# Altium PCB OmniCore_SDR.PcbDoc (part 6 of 13)
Units mil, origin at the board's own origin, x right, y up, seen from the top; angles counter-clockwise.
Board outline 4724.72 x 2755.91 mil, 8 copper layers (Top, GND 1, Layer 1, Layer 2, GND 2, Layer 3, Power, Bottom), stack 40.468 mil thick; 530 components, 427 nets, 2315 pads, 1715 vias.
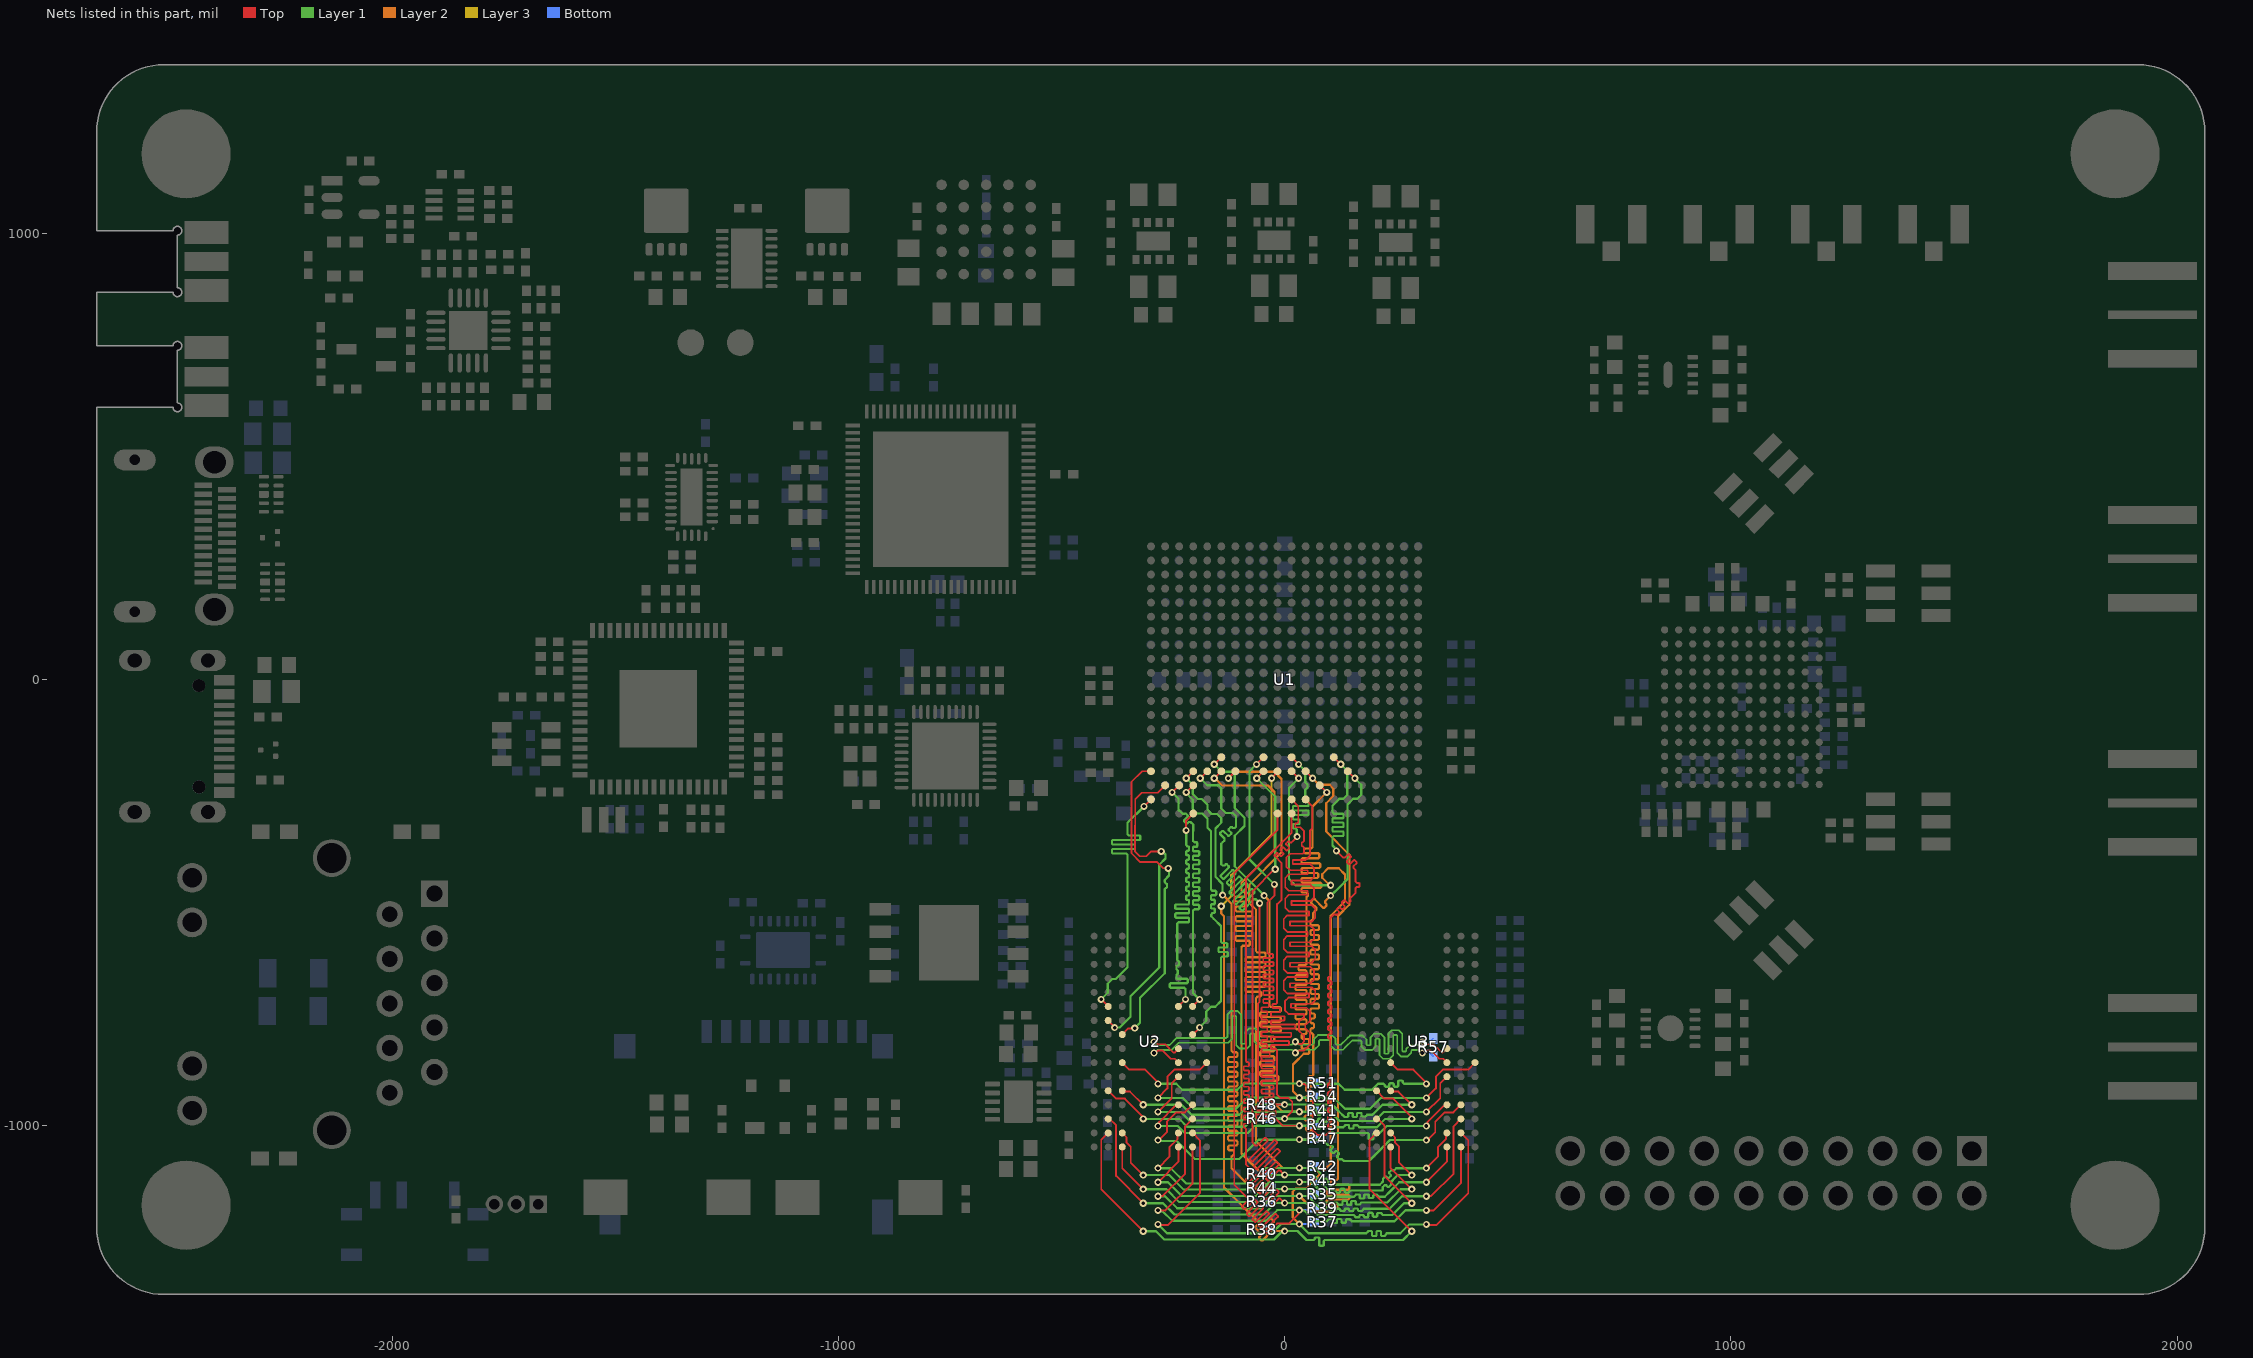
[diagram p11: the nets of this part, all layers, seen from the top]

## Via types
v1: diameter 16, hole 8, Top to Bottom, tented both sides, 1667 vias
v2: diameter 19.68, hole 7.87, Top to Bottom, 44 vias
v3: diameter 200, hole 125, Top to Bottom, 4 vias

## Nets (pads, with @x,y where several pads share a name; then routed paths per layer and width w, separated by ;. In a path a pad name is that pad's centre, name@x,y a point inside that pad or via, vN(x,y) a via of type N, cw(c..) or ccw(c..) an arc to the next point about the centre after c; other vN are vias at no path point) (continued)
DDR3_A4: R35.2 U1.M4 U2.P8 U3.P8 | length 2510.2
  Top w4.2: v1(-283.85,-1157.9) -282.92,-1156.97 -272.97,-1156.97 -223,-1107 -223,-1000.94 U2.P8@-206.5,-984.45 ; U1.M4@47,-205.51 47,-205.64 62.5,-221.14 v1(62.5,-221.26) ; v1(317.64,-1157.9) 318.58,-1156.97 328.53,-1156.97 378.5,-1107 378.5,-1000.94 U3.P8@394.99,-984.45
  Layer 1 w5: v1(-283.85,-1157.9) -268.1,-1157.9 -241,-1185 -53,-1185 -25.44,-1157.44 v1(33,-1157.44) 51.44,-1157.44 80,-1186 89,-1186 91.5,-1186 94.43,-1183.07 94.43,-1182.5 95.93,-1181 102.93,-1181 104.43,-1182.5 104.43,-1189.5 105.93,-1191 112.93,-1191 114.43,-1189.5 114.43,-1187.5 115.93,-1186 122.93,-1186 124.43,-1187.5 124.43,-1189.5 125.93,-1191 132.93,-1191 134.43,-1189.5 134.43,-1187.5 135.93,-1186 142.93,-1186 144.43,-1187.5 144.43,-1189.5 145.93,-1191 152.93,-1191 154.43,-1189.5 154.43,-1186.93 155.93,-1185.43 162.93,-1185.43 164.43,-1186.93 164.43,-1189.5 165.93,-1191 172.93,-1191 174.43,-1189.5 174.43,-1188.93 177.36,-1186 199,-1186 235,-1186 263.1,-1157.9 v1(317.64,-1157.9)
  Layer 2 w5: v1(33,-1157.44) 68,-1192.44 96.56,-1192.44 108.56,-1192.44 110,-1191 115.17,-1185.83 117.67,-1183.33 117.67,-1179.18 114.75,-1176.26 96.7,-1176.26 94.5,-1174.06 94.5,-1167.46 96.7,-1165.26 142.3,-1165.26 144.5,-1163.06 144.5,-1156.46 142.3,-1154.26 96.7,-1154.26 94.5,-1152.06 94.5,-1145.46 96.7,-1143.26 142.3,-1143.26 144.5,-1141.06 144.5,-1134.46 142.3,-1132.26 105.83,-1132.26 103.63,-1130.06 103.63,-1123.46 105.83,-1121.26 116.57,-1121.26 119.5,-1118.33 119.5,-1088 119.5,-530 145,-504.5 145,-392.49 93,-340.49 93,-277 109,-261 109,-243.93 100.83,-235.76 77,-235.76 v1(62.5,-221.26)
  Bottom w4.2: v1(33,-1157.44) 61.19,-1157.44 R35.2@65,-1153.64
DDR3_A5: R36.2 U1.L1 U2.P2 U3.P2 | length 2527.9
  Top w4.2: U2.P2@-395.48,-984.45 -392.56,-984.45 -377.95,-999.05 -377.95,-1112.33 v1(-316.85,-1173.42) ; v1(0,-1172.96) -8.48,-1164.48 -9.97,-1162.99 -13.44,-1162.99 -28.33,-1177.88 -30.29,-1177.88 -34.84,-1173.33 -34.84,-1171.38 -13.41,-1149.95 -13.41,-1148 -17.96,-1143.44 -19.91,-1143.44 -41.46,-1164.99 -43.41,-1164.99 -47.97,-1160.44 -47.97,-1158.48 -27.32,-1137.84 -27.32,-1135.89 -31.88,-1131.33 -33.83,-1131.33 -54.47,-1151.98 -56.42,-1151.98 -60.98,-1147.43 -60.98,-1145.47 -45.21,-1129.7 -45.21,-1127.75 -49.76,-1123.2 -51.71,-1123.2 -67.48,-1138.97 -69.43,-1138.97 -73.99,-1134.41 -73.99,-1132.46 -58.22,-1116.69 -58.22,-1114.74 -62.77,-1110.19 -64.72,-1110.19 -80.49,-1125.96 -82.45,-1125.96 -87,-1121.4 -87,-1119.45 -71.99,-1104.45 -71.99,-1100.97 -87,-1085.96 -87,-1028 -87,-1009 -87,-1006.9 -89.46,-1004.44 -90.42,-1004.44 -91.8,-1003.06 -91.8,-996.62 -90.42,-995.24 -81.58,-995.24 -80.2,-993.86 -80.2,-987.42 -81.58,-986.04 -90.42,-986.04 -91.8,-984.66 -91.8,-978.22 -90.42,-976.84 -81.58,-976.84 -80.2,-975.46 -80.2,-969.02 -81.58,-967.64 -90.42,-967.64 -91.8,-966.26 -91.8,-959.82 -90.42,-958.44 -81.58,-958.44 -80.2,-957.06 -80.2,-950.62 -81.58,-949.24 -90.42,-949.24 -91.8,-947.86 -91.8,-941.42 -90.42,-940.04 -81.58,-940.04 -80.2,-938.66 -80.2,-932.22 -81.58,-930.84 -90.42,-930.84 -91.8,-929.46 -91.8,-923.02 -90.42,-921.64 -81.58,-921.64 -80.2,-920.26 -80.2,-913.82 -81.58,-912.44 -90.42,-912.44 -91.8,-911.06 -91.8,-904.62 -90.42,-903.24 -81.58,-903.24 -80.2,-901.86 -80.2,-895.42 -81.58,-894.04 -90.42,-894.04 -91.8,-892.66 -91.8,-886.22 -90.42,-884.84 -81.58,-884.84 -80.2,-883.46 -80.2,-877.02 -81.58,-875.64 -90.42,-875.64 -91.8,-874.26 -91.8,-867.82 -90.42,-866.44 -81.65,-866.44 -80.27,-865.06 -80.27,-858.62 -81.65,-857.24 -84.54,-857.24 -87,-854.78 -87,-821 -87,-446 9.5,-349.5 15.5,-343.5 U1.L1@15.5,-300 ; U3.P2@206.02,-984.45 208.94,-984.45 223.55,-999.05 223.55,-1112.33 v1(284.64,-1173.42)
  Layer 1 w5: v1(-316.85,-1173.42) -272.58,-1173.42 -247,-1199 -47,-1199 -20.96,-1172.96 v1(0,-1172.96) 46.96,-1172.96 74,-1200 142,-1200 154.5,-1200 157.43,-1202.93 157.43,-1203.5 158.93,-1205 165.93,-1205 167.43,-1203.5 167.43,-1201.5 168.93,-1200 175.93,-1200 177.43,-1201.5 177.43,-1203.5 178.93,-1205 185.93,-1205 187.43,-1203.5 187.43,-1196.5 188.93,-1195 195.93,-1195 197.43,-1196.5 197.43,-1202.13 198.93,-1203.63 205.93,-1203.63 207.43,-1202.13 207.43,-1197.07 208.93,-1195.57 215.93,-1195.57 217.43,-1197.07 220.36,-1200 241,-1200 267.58,-1173.42 v1(284.64,-1173.42)
  Bottom w4.2: R36.2@-32,-1170.67 -29.71,-1172.96 v1(0,-1172.96)
DDR3_A6: R37.2 U1.L4 U2.R8 U3.R8 | length 2557.4
  Top w4.2: v1(-283.85,-1220.9) -282.75,-1222 -261,-1222 -190,-1151 -190,-1032.45 U2.R8@-206.5,-1015.94 ; U1.L4@15.5,-205.51 v1(31.25,-221.26) ; v1(317.64,-1220.9) 318.75,-1222 340.5,-1222 411.5,-1151 411.5,-1032.45 U3.R8@394.99,-1015.94
  Layer 1 w5: v1(-283.85,-1220.9) -263.75,-1241 -29,-1241 -8,-1220 32.57,-1220 v1(33,-1220.43) 53.57,-1241 101,-1241 180.5,-1241 183,-1241 185.93,-1238.07 185.93,-1237.5 187.43,-1236 194.43,-1236 195.93,-1237.5 195.93,-1245.5 197.43,-1247 204.43,-1247 205.93,-1245.5 205.93,-1237.5 207.43,-1236 214.43,-1236 215.93,-1237.5 215.93,-1245.23 217.43,-1246.73 224.43,-1246.73 225.93,-1245.23 225.93,-1243.93 228.86,-1241 259,-1241 279.1,-1220.9 v1(317.64,-1220.9) ; v1(31.25,-221.26) 9.5,-243.01 9.5,-446.5 24,-461 v1(103,-461)
  Layer 2 w5: v1(33,-1220.43) 18,-1205.43 18,-1148 25,-1141 47,-1141 58,-1130 76,-1112 77.77,-1110.23 77.77,-1106.09 72,-1100.32 72,-1097.21 76.66,-1092.54 79.77,-1092.54 85.55,-1098.31 89.69,-1098.31 95.5,-1092.5 103,-1085 103,-529 135,-497 135,-437 121,-423 97,-423 84,-436 84,-444 101,-461 v1(103,-461)
  Bottom w4.2: v1(33,-1220.43) 60.57,-1220.43 R37.2@65,-1216
DDR3_A7: R38.2 U1.K4 U2.R2 U3.R2 | length 2519.2
  Top w4.2: U2.R2@-395.48,-1015.94 -411,-1031.46 -411,-1142.27 v1(-316.85,-1236.41) ; v1(-29.31,-220.96) -29.31,-219.9 -15.99,-206.57 U1.K4@-15.99,-205.51 ; U3.R2@206.02,-1015.94 190.5,-1031.46 190.5,-1142.27 v1(284.64,-1236.41)
  Layer 1 w5: v1@-316.82,-1236.45 -288.55,-1236.45 -270,-1255 -24,-1255 -7.06,-1238.06 -2.1,-1238.06 v1(0,-1235.95) 28.95,-1235.95 49,-1256 62,-1256 64.5,-1256 67.43,-1253.07 67.43,-1251.5 68.93,-1250 75.93,-1250 77.43,-1251.5 77.43,-1267.52 78.93,-1269.02 85.93,-1269.02 87.43,-1267.52 87.43,-1258.93 90.36,-1256 108.07,-1256 265.06,-1256 v1(284.64,-1236.41)
  Layer 2 w5: v1(-142,-508) -142,-523.98 -135.76,-530.22 -135.76,-1138.24 -89.5,-1184.5 -87.73,-1186.27 -58.83,-1215.17 -58.83,-1219.31 -66.05,-1226.53 -66.05,-1228.86 -60.6,-1234.31 -58.27,-1234.31 -32.47,-1208.51 -30.14,-1208.51 -24.69,-1213.95 -24.69,-1216.28 -57.72,-1249.31 -57.72,-1251.64 -52.27,-1257.08 -49.94,-1257.08 -28.8,-1235.95 -25.27,-1235.95 v1(0,-1235.95)
  Layer 3 w5: v1(-142,-508) -119.5,-485.5 -119.5,-438.5 -29.31,-348.31 v1(-29.31,-220.96)
  Bottom w4.2: R38.2@-32,-1233 -29.05,-1235.95 v1(0,-1235.95)
DDR3_A8: R39.2 U1.K1 U2.T8 U3.T8 | length 2486.6
  Top w4.2: v1(-283.85,-1189.4) -267.4,-1189.4 -206.5,-1128.5 U2.T8@-206.5,-1047.44 ; U1.K1@-15.99,-300 -15.99,-336.99 -113,-434 -113,-1132 -104.75,-1140.25 -81.77,-1163.23 -81.77,-1166.71 -95.54,-1180.47 -95.54,-1182.42 -90.98,-1186.97 -89.03,-1186.97 -67.8,-1165.75 -65.85,-1165.75 -61.3,-1170.3 -61.3,-1172.25 -84.75,-1195.7 -84.75,-1197.65 -80.2,-1202.21 -78.24,-1202.21 -54.79,-1178.76 -52.84,-1178.76 -48.29,-1183.31 -48.29,-1185.26 -71.74,-1208.71 -71.74,-1210.67 -67.18,-1215.22 -65.23,-1215.22 -41.78,-1191.77 -39.83,-1191.77 -35.28,-1196.32 -35.28,-1198.27 -58.73,-1221.72 -58.73,-1223.68 -54.17,-1228.23 -52.22,-1228.23 -21.58,-1197.59 -19.63,-1197.59 -15.08,-1202.14 -15.08,-1204.09 -45.72,-1234.74 -45.72,-1236.69 -41.16,-1241.24 -39.21,-1241.24 -16.53,-1218.56 -13.56,-1218.56 10.44,-1218.56 30.74,-1198.26 30.74,-1191.2 v1(33,-1188.94) ; v1(317.64,-1189.4) 334.1,-1189.4 394.99,-1128.5 U3.T8@394.99,-1047.44
  Layer 1 w5: v1(-283.85,-1189.4) -282.02,-1191.23 -273.77,-1191.23 -252,-1213 -41,-1213 -16.94,-1188.94 v1(33,-1188.94) 33.99,-1189.93 43.93,-1189.93 68,-1214 92,-1214 94.5,-1214 97.43,-1211.07 97.43,-1210.5 98.93,-1209 105.93,-1209 107.43,-1210.5 107.43,-1216.5 108.93,-1218 115.93,-1218 117.43,-1216.5 117.43,-1210.5 118.93,-1209 125.93,-1209 127.43,-1210.5 127.43,-1215.65 128.93,-1217.15 135.93,-1217.15 137.43,-1215.65 137.43,-1211.07 138.93,-1209.57 145.93,-1209.57 147.43,-1211.07 150.36,-1214 161,-1214 246,-1214 270.6,-1189.4 v1(317.64,-1189.4)
  Bottom w4.2: v1(33,-1188.94) 60.88,-1188.94 R39.2@65,-1184.82
DDR3_A9: R40.2 U1.J4 U2.R3 U3.R3 | length 2405.6
  Top w4.2: U2.R3@-363.98,-1015.94 -363.98,-1016.41 -354.2,-1026.19 -354.2,-1037.47 -345,-1046.67 -345,-1082.28 v1(-316.85,-1110.43) ; v1(-62.5,-221) -62.5,-220.76 -47.49,-205.75 U1.J4@-47.49,-205.51 ; v1(-21,-425) -23,-425 -72,-474 -72,-981 -72,-1037.97 -65.49,-1044.48 -62.01,-1044.48 -44.6,-1027.07 -42.65,-1027.07 -38.1,-1031.62 -38.1,-1033.57 -77.82,-1073.3 -77.82,-1075.25 -73.27,-1079.8 -71.32,-1079.8 -23.43,-1031.92 -21.48,-1031.92 -16.93,-1036.47 -16.93,-1038.42 -68.96,-1090.45 -68.96,-1092.41 -64.4,-1096.96 -62.45,-1096.96 -17.18,-1051.69 -15.23,-1051.69 -10.68,-1056.24 -10.68,-1058.19 -55.95,-1103.46 -55.95,-1105.42 -51.39,-1109.97 -49.44,-1109.97 -19.92,-1080.45 -17.97,-1080.45 -13.41,-1085 -13.41,-1086.95 -42.94,-1116.48 -42.94,-1118.43 -38.38,-1122.98 -36.43,-1122.98 -13.45,-1100 -9.97,-1100 -8.48,-1101.48 v1(0,-1109.97) ; U3.R3@237.51,-1015.94 237.51,-1016.41 247.3,-1026.19 247.3,-1037.47 256.5,-1046.67 256.5,-1082.28 v1(284.64,-1110.43)
  Layer 1 w5: v1(-316.85,-1110.43) -258.57,-1110.43 -226,-1143 -71,-1143 -37.97,-1109.97 v1(0,-1109.97) 63.97,-1109.97 95,-1141 99,-1145 111.64,-1145 114.57,-1147.93 114.57,-1148.5 116.07,-1150 123.07,-1150 124.57,-1148.5 124.57,-1142.5 126.07,-1141 133.07,-1141 134.57,-1142.5 134.57,-1148.5 136.07,-1150 143.07,-1150 144.57,-1148.5 144.57,-1147.93 147.5,-1145 203,-1145 217.28,-1145 219,-1145 219.91,-1144.09 219.91,-1139.95 219.91,-1137.82 224.86,-1132.87 226.98,-1132.87 231.13,-1137.02 233.25,-1137.02 238.2,-1132.07 238.2,-1129.95 238.19,-1125.81 248,-1116 253.57,-1110.43 v1(284.64,-1110.43) ; v1(-62.5,-221) -21,-262.51 v1(-21,-425)
  Bottom w4.2: R40.2@-32,-1108.33 -30.37,-1109.97 v1(0,-1109.97)
DDR3_A10: R41.2 U1.F5 U2.L7 U3.L7 | length 2387.8
  Top w4.2: v1(-283.85,-968.93) -253,-938.07 -253,-904.96 U2.L7@-238,-889.96 ; v1(-157.72,-189.76) U1.F5@-141.98,-174.02 ; v1(317.64,-968.93) 348.5,-938.07 348.5,-904.96 U3.L7@363.5,-889.96
  Layer 1 w5: v1(-283.85,-968.93) -233.07,-968.93 -214,-988 -95,-988 -75.47,-968.47 v1(33,-968.47) 55,-968.47 57.5,-968.47 60.43,-965.54 60.43,-962.99 61.93,-961.49 68.93,-961.49 70.43,-962.99 70.43,-973.48 71.93,-974.98 78.93,-974.98 80.43,-973.48 80.43,-963.07 81.93,-961.57 88.93,-961.57 90.43,-963.07 90.43,-965.54 93.36,-968.47 102.47,-968.47 123,-989 202,-989 222.07,-968.93 v1(317.64,-968.93) ; v1(-157.72,-189.76) -140.73,-206.76 -118.24,-206.76 -111.73,-213.27 -111.73,-288 -97.73,-302 -90,-309.73 -90,-328.27 -111.73,-350 -111.73,-418.27 v1(-46,-484)
  Layer 2 w5: v1(-46,-484) -34.03,-495.97 -34.03,-518 -34.03,-728.48 -34.03,-730.98 -31.1,-733.91 -11.23,-733.91 -9.03,-736.11 -9.03,-742.71 -11.23,-744.91 -52.8,-744.91 -55,-747.11 -55,-753.71 -52.8,-755.91 -11.23,-755.91 -9.03,-758.11 -9.03,-764.71 -11.23,-766.91 -52.8,-766.91 -55,-769.11 -55,-775.71 -52.8,-777.91 -11.23,-777.91 -9.03,-780.11 -9.03,-786.71 -11.23,-788.91 -52.8,-788.91 -55,-791.11 -55,-797.71 -52.8,-799.91 -25.56,-799.91 -23.36,-802.11 -23.36,-808.71 -25.56,-810.91 -52.8,-810.91 -55,-813.11 -55,-819.71 -52.8,-821.91 -25.7,-821.91 -23.5,-824.11 -23.5,-830.71 -25.7,-832.91 -52.8,-832.91 -55,-835.11 -55,-841.71 -52.8,-843.91 -25.7,-843.91 -23.5,-846.11 -23.5,-852.71 -25.7,-854.91 -52.8,-854.91 -55,-857.11 -55,-863.71 -52.8,-865.91 -25.7,-865.91 -23.5,-868.11 -23.5,-874.71 -25.7,-876.91 -52.8,-876.91 -55,-879.11 -55,-885.71 -52.8,-887.91 -16.7,-887.91 -14.5,-890.11 -14.5,-896.71 -16.7,-898.91 -50.36,-898.91 -52.56,-901.11 -52.56,-907.71 -50.36,-909.91 -36.96,-909.91 -34.03,-912.84 -34.03,-929 -34.03,-938.96 -4.53,-968.47 v1(33,-968.47)
  Bottom w4.2: v1(33,-968.47) 63.08,-968.47 R41.2@65,-966.55
DDR3_A11: R42.2 U1.G4 U2.R7 U3.R7 | length 2402
  Top w4.2: v1(-283.85,-1094.91) -258.2,-1069.26 -258.2,-1047.89 -240.21,-1029.9 -240.21,-1018.15 U2.R7@-238,-1015.94 ; v1(-126.23,-221.26) U1.G4@-110.48,-205.51 ; v1(317.64,-1094.91) 343.3,-1069.26 343.3,-1047.89 361.29,-1029.9 361.29,-1018.15 U3.R7@363.5,-1015.94
  Layer 1 w5: v1(-283.85,-1094.91) -255.09,-1094.91 -221,-1129 -77,-1129 -42.45,-1094.45 v1(33,-1094.45) 68.45,-1094.45 73.5,-1099.5 75.27,-1101.27 82.34,-1108.34 82.34,-1112.48 81.83,-1112.99 81.83,-1115.11 86.78,-1120.06 88.91,-1120.06 90.96,-1118 93.08,-1118 98.03,-1122.95 98.03,-1125.08 95.98,-1127.13 95.98,-1129.25 100.93,-1134.2 103.05,-1134.2 105.25,-1132 126,-1132 213,-1132 218.5,-1126.5 220.27,-1124.73 220.27,-1120.59 220.26,-1118.46 225.21,-1113.51 227.33,-1113.51 230.9,-1117.08 233.02,-1117.08 237.97,-1112.13 237.97,-1110.01 234.41,-1106.45 234.41,-1104.33 239.36,-1099.38 241.48,-1099.38 245.62,-1099.38 250.09,-1094.91 v1(317.64,-1094.91)
  Layer 2 w5: v1(-126.23,-221.26) -111.43,-206.46 -23.31,-206.46 -7,-222.77 -7,-387 -79.5,-459.5 -79.5,-500.5 -64,-516 -64,-606 -64,-608.5 -61.07,-611.43 -45.23,-611.43 -43.03,-613.63 -43.03,-620.23 -45.23,-622.43 -85.8,-622.43 -88,-624.63 -88,-631.23 -85.8,-633.43 -45.23,-633.43 -43.03,-635.63 -43.03,-642.23 -45.23,-644.43 -85.8,-644.43 -88,-646.63 -88,-653.23 -85.8,-655.43 -45.23,-655.43 -43.03,-657.63 -43.03,-664.23 -45.23,-666.43 -85.8,-666.43 -88,-668.63 -88,-675.23 -85.8,-677.43 -45.23,-677.43 -43.03,-679.63 -43.03,-686.23 -45.23,-688.43 -85.8,-688.43 -88,-690.63 -88,-697.23 -85.8,-699.43 -54.68,-699.43 -52.48,-701.63 -52.48,-708.23 -54.68,-710.43 -61.07,-710.43 -64,-713.36 -64,-728.18 -64,-755.93 -64,-833 -64,-978 -64,-1034.98 -4.53,-1094.45 v1(33,-1094.45)
  Bottom w4.2: v1(33,-1094.45) 61.82,-1094.45 R42.2@65,-1091.27
DDR3_A12: R43.2 U1.E4 U2.N7 U3.N7 | length 2349.8
  Top w4.2: v1(-283.85,-1000.42) -281.6,-998.17 -281.6,-991.6 -245.16,-955.16 -240.21,-955.16 U2.N7@-238,-952.95 ; v1(-189.22,-221.26) U1.E4@-173.47,-205.51 ; v1(-56.2,-501.2) -56.2,-722.26 -60,-726.06 -60,-943.92 -53.56,-950.36 -53.56,-953.84 -56.02,-956.3 -62.42,-956.3 -63.8,-957.68 -63.8,-964.12 -62.42,-965.5 -21.38,-965.5 -20,-966.88 -20,-973.32 -21.38,-974.7 -62.42,-974.7 -63.8,-976.08 -63.8,-982.52 -62.42,-983.9 -20.02,-983.9 -17.92,-986 -3.96,-999.96 v1(33,-999.96) ; v1(317.64,-1000.42) 319.9,-998.17 319.9,-991.6 356.34,-955.16 361.29,-955.16 U3.N7@363.5,-952.95
  Layer 1 w5: v1(-283.85,-1000.42) -239.58,-1000.42 -224,-1016 -83,-1016 -66.96,-999.96 v1(33,-999.96) 53,-999.96 65.5,-999.96 68.43,-1002.89 68.43,-1005.21 69.93,-1006.71 76.93,-1006.71 78.43,-1005.21 78.43,-1002.89 81.36,-999.96 93.96,-999.96 110,-1016 185.5,-1016 188.43,-1018.93 188.43,-1029.38 189.93,-1030.88 196.93,-1030.88 198.43,-1029.38 198.43,-1018.93 201.36,-1016 213,-1016 228.58,-1000.42 232.29,-1000.42 v1(317.64,-1000.42) ; v1(-189.22,-221.26) -173.48,-237 -148,-237 -142,-243 -142,-288.99 -132.23,-298.75 -116.25,-298.75 -109,-306 -109,-322 -109,-329.68 -111.93,-332.61 -116.07,-332.61 -118.27,-330.41 -120.39,-330.41 -125.34,-335.36 -125.34,-337.48 -119.68,-343.14 -119.68,-345.27 -124.63,-350.22 -126.75,-350.22 -137.87,-339.09 -139.99,-339.09 -144.94,-344.04 -144.94,-346.17 -134.85,-356.25 -134.85,-360.4 -138.73,-364.27 -142,-367.54 -142,-371 -142,-413.9 -139.07,-416.83 -134.93,-416.83 -131.84,-413.74 -129.72,-413.74 -124.77,-418.69 -124.77,-420.81 -143.05,-439.1 -143.05,-441.22 -138.1,-446.17 -135.98,-446.17 -117.33,-427.52 -115.21,-427.52 -110.26,-432.47 -110.26,-434.59 -129.54,-453.87 -129.54,-455.99 -124.59,-460.94 -122.47,-460.94 -103.19,-441.66 -101.07,-441.66 -96.12,-446.61 -96.12,-448.73 -123.54,-476.15 -123.54,-478.27 -118.59,-483.22 -116.47,-483.22 -89.05,-455.8 -86.93,-455.8 -81.98,-460.75 -81.98,-462.87 -115.48,-496.37 -115.48,-498.49 -110.53,-503.44 -108.41,-503.44 -74.91,-469.94 -72.78,-469.94 -67.83,-474.89 -67.83,-477.01 -101.34,-510.52 -101.34,-512.64 -96.39,-517.59 -94.26,-517.59 -69.11,-492.43 -64.97,-492.43 -63.2,-494.2 v1(-56.2,-501.2)
  Bottom w4.2: v1(33,-999.96) 62.77,-999.96 R43.2@65,-997.73
DDR3_A13: R44.2 U1.D4 U2.T3 U3.T3 | length 2411.6
  Top w4.2: U2.T3@-363.98,-1047.44 -363.98,-1094.8 v1(-316.85,-1141.93) ; v1(-220.72,-221.26) U1.D4@-204.97,-205.51 ; U3.T3@237.51,-1047.44 237.51,-1094.8 v1(284.64,-1141.93)
  Layer 1 w5: v1(-316.85,-1141.93) -265.07,-1141.93 -236,-1171 -59,-1171 -29.46,-1141.46 v1(0,-1141.46) 55.46,-1141.46 86,-1172 104,-1172 116.5,-1172 119.43,-1174.93 119.43,-1175.5 120.93,-1177 127.93,-1177 129.43,-1175.5 129.43,-1169.5 130.93,-1168 137.93,-1168 139.43,-1169.5 139.43,-1175.5 140.93,-1177 147.93,-1177 149.43,-1175.5 149.43,-1170.06 150.93,-1168.56 157.93,-1168.56 159.43,-1170.06 159.43,-1174.93 160.93,-1176.43 167.93,-1176.43 169.43,-1174.93 172.36,-1172 190,-1172 230,-1172 260.07,-1141.93 v1(284.64,-1141.93) ; v1(-220.72,-221.26) -206,-235.98 -206,-256.48 -195.12,-267.36 -185.88,-267.36 -173,-280.25 -173,-292 -164,-301 -151,-301 -142,-310 -142,-320.53 -155,-333.53 -155,-442 -139.1,-457.9 v1(-139.1,-483)
  Layer 2 w5: v1(-139.1,-483) -138.36,-483 -119,-502.36 -119,-708 -119,-829.5 -119,-832 -116.07,-834.93 -108.2,-834.93 -106,-837.13 -106,-843.73 -108.2,-845.93 -124.56,-845.93 -126.76,-848.13 -126.76,-854.73 -124.56,-856.93 -108.2,-856.93 -106,-859.13 -106,-865.73 -108.2,-867.93 -124.56,-867.93 -126.76,-870.13 -126.76,-876.73 -124.56,-878.93 -108.2,-878.93 -106,-881.13 -106,-887.73 -108.2,-889.93 -124.56,-889.93 -126.76,-892.13 -126.76,-898.73 -124.56,-900.93 -108.2,-900.93 -106,-903.13 -106,-909.73 -108.2,-911.93 -124.56,-911.93 -126.76,-914.13 -126.76,-920.73 -124.56,-922.93 -108.2,-922.93 -106,-925.13 -106,-931.73 -108.2,-933.93 -124.56,-933.93 -126.76,-936.13 -126.76,-942.73 -124.56,-944.93 -108.2,-944.93 -106,-947.13 -106,-953.73 -108.2,-955.93 -124.56,-955.93 -126.76,-958.13 -126.76,-964.73 -124.56,-966.93 -108.2,-966.93 -106,-969.13 -106,-975.73 -108.2,-977.93 -124.56,-977.93 -126.76,-980.13 -126.76,-986.73 -124.56,-988.93 -108.2,-988.93 -106,-991.13 -106,-997.73 -108.2,-999.93 -124.56,-999.93 -126.76,-1002.13 -126.76,-1008.73 -124.56,-1010.93 -108.2,-1010.93 -106,-1013.13 -106,-1019.73 -108.2,-1021.93 -124.56,-1021.93 -126.76,-1024.13 -126.76,-1030.73 -124.56,-1032.93 -108.2,-1032.93 -106,-1035.13 -106,-1041.73 -108.2,-1043.93 -124.48,-1043.93 -126.68,-1046.13 -126.68,-1052.73 -124.48,-1054.93 -116.07,-1054.93 -113.87,-1057.13 -113.87,-1063.73 -116.07,-1065.93 -119,-1068.86 -119,-1086.85 -119,-1095 -72.54,-1141.46 v1(0,-1141.46)
  Bottom w4.2: R44.2@-32,-1139.5 -30.04,-1141.46 v1(0,-1141.46)
DDR3_A14: R45.2 U1.F4 U2.T7 U3.T7 | length 2397.4
  Top w4.2: v1(-283.85,-1126.41) -238,-1080.55 U2.T7@-238,-1047.44 ; v1(-157.72,-221.26) U1.F4@-141.98,-205.51 ; v1(317.64,-1126.41) 363.5,-1080.55 U3.T7@363.5,-1047.44
  Layer 1 w5: v1(-283.85,-1126.41) -261.59,-1126.41 -231,-1157 -65,-1157 -33.95,-1125.95 v1(33,-1125.95) 59.95,-1125.95 93,-1159 133,-1159 155.5,-1159 158.43,-1156.07 158.43,-1155.5 159.93,-1154 166.93,-1154 168.43,-1155.5 168.43,-1161.5 169.93,-1163 176.93,-1163 178.43,-1161.5 178.43,-1155.5 179.93,-1154 186.93,-1154 188.43,-1155.5 188.43,-1160.53 189.93,-1162.03 196.93,-1162.03 198.43,-1160.53 198.43,-1156.07 199.93,-1154.57 206.93,-1154.57 208.43,-1156.07 211.36,-1159 224,-1159 236,-1147 256.59,-1126.41 v1(317.64,-1126.41)
  Layer 2 w5: v1(-157.72,-221.26) -155.99,-221.26 -139.75,-237.5 -37.5,-237.5 -23,-252 -23,-381 -97,-455 -97,-470 -97,-472.5 -94.07,-475.43 -90.7,-475.43 -88.5,-477.63 -88.5,-484.23 -90.7,-486.43 -109.27,-486.43 -111.47,-488.63 -111.47,-495.23 -109.27,-497.43 -90.7,-497.43 -88.5,-499.63 -88.5,-506.23 -90.7,-508.43 -107.8,-508.43 -110,-510.63 -110,-517.23 -107.8,-519.43 -75.5,-519.43 -73.3,-521.63 -73.3,-528.23 -75.5,-530.43 -107.8,-530.43 -110,-532.63 -110,-539.23 -107.8,-541.43 -75.2,-541.43 -73,-543.63 -73,-550.23 -75.2,-552.43 -107.8,-552.43 -110,-554.63 -110,-561.23 -107.8,-563.43 -75.2,-563.43 -73,-565.63 -73,-572.23 -75.2,-574.43 -107.8,-574.43 -110,-576.63 -110,-583.23 -107.8,-585.43 -80.34,-585.43 -78.14,-587.63 -78.14,-594.23 -80.34,-596.43 -94.07,-596.43 -97,-599.36 -97,-637 -97,-786 -97,-1062 -33.05,-1125.95 v1(33,-1125.95)
  Bottom w4.2: v1(33,-1125.95) 61.51,-1125.95 R45.2@65,-1122.45
DDR3_BA0: R46.2 U1.L5 U2.M2 U3.M2 | length 2387.7
  Top w4.2: U2.M2@-395.48,-921.45 -377.95,-938.99 -358.2,-938.99 -319.11,-978.07 -319.11,-982.19 v1(-316.85,-984.45) ; v1(0,-983.98) 17,-966.98 17,-946.46 8.54,-938 -9,-938 -17,-930 -17,-832.75 -17,-830.65 -19.46,-828.19 -29.42,-828.19 -30.8,-826.81 -30.8,-820.37 -29.42,-818.99 8.37,-818.99 9.75,-817.61 9.75,-811.17 8.37,-809.79 -29.42,-809.79 -30.8,-808.41 -30.8,-801.97 -29.42,-800.59 13.48,-800.59 14.86,-799.21 14.86,-792.77 13.48,-791.39 -29.42,-791.39 -30.8,-790.01 -30.8,-783.57 -29.42,-782.19 22.44,-782.19 23.82,-780.81 23.82,-774.37 22.44,-772.99 -29.42,-772.99 -30.8,-771.61 -30.8,-765.17 -29.42,-763.79 -1.46,-763.79 -0.08,-762.41 -0.08,-755.97 -1.46,-754.59 -29.42,-754.59 -30.8,-753.21 -30.8,-746.77 -29.42,-745.39 -11.48,-745.39 -10.1,-744.01 -10.1,-737.57 -11.48,-736.19 -26.15,-736.19 -27.53,-734.81 -27.53,-728.37 -26.15,-726.99 -19.46,-726.99 -17,-724.53 -17,-503 -7,-493 -6.9,-493 -6.9,-414.16 -6.9,-411.19 -22.77,-395.32 -22.77,-393.37 -18.22,-388.81 -16.26,-388.81 -9.33,-395.75 -7.38,-395.75 -2.83,-391.19 -2.83,-389.24 -9.76,-382.31 -9.76,-380.36 -5.21,-375.8 -3.25,-375.8 3.76,-382.82 5.72,-382.82 10.27,-378.27 10.27,-376.31 3.25,-369.3 3.25,-367.34 7.81,-362.79 9.76,-362.79 11.74,-364.78 15.22,-364.78 18,-362 v1(28,-352) ; U1.L5@15.5,-174.02 15.5,-174.13 31.25,-189.88 v1(31.25,-190) ; U3.M2@206.02,-921.45 223.55,-938.99 243.3,-938.99 282.39,-978.07 282.39,-982.19 v1(284.64,-984.45)
  Layer 1 w5: v1(-316.85,-984.45) -236.55,-984.45 -219,-1002 -89,-1002 -70.98,-983.98 v1(0,-983.98) 48.99,-983.98 61.49,-983.98 64.42,-986.91 64.42,-989.46 65.92,-990.96 72.92,-990.96 74.42,-989.46 74.42,-985.48 75.92,-983.98 82.92,-983.98 84.42,-985.48 84.42,-989.46 85.92,-990.96 92.92,-990.96 96.87,-987.01 101.01,-987.01 117,-1003 131.49,-1003 134.42,-1000.07 134.42,-999.5 135.92,-998 142.92,-998 144.42,-999.5 144.42,-1004.76 145.92,-1006.26 152.92,-1006.26 154.42,-1004.76 154.42,-1000.07 155.92,-998.57 162.92,-998.57 164.42,-1000.07 167.35,-1003 183.18,-1003 207,-1003 225.55,-984.45 v1(284.64,-984.45) ; v1(28,-352) 27,-351 27,-339 27,-336.5 24.07,-333.57 19.5,-333.57 18.5,-332.57 18.5,-324.57 19.5,-323.57 32.5,-323.57 33.5,-322.57 33.5,-314.57 32.5,-313.57 19.5,-313.57 18.5,-312.57 18.5,-304.57 19.5,-303.57 52.5,-303.57 53.5,-302.57 53.5,-294.57 52.5,-293.57 19.5,-293.57 18.5,-292.57 18.5,-284.57 19.5,-283.57 52.5,-283.57 53.5,-282.57 53.5,-274.57 52.5,-273.57 41.94,-273.57 40.94,-272.57 40.94,-264.57 41.94,-263.57 43.07,-263.57 46,-260.64 46,-246.5 48.93,-243.57 50.18,-243.57 51.18,-242.57 51.18,-234.57 50.18,-233.57 48.93,-233.57 46,-230.64 46,-219 46,-204.75 v1(31.25,-190)
  Bottom w4.2: R46.2@-32,-983.67 -31.68,-983.98 v1(0,-983.98)
DDR3_BA1: R47.2 U1.R4 U2.N8 U3.N8 | length 2433.1
  Top w4.2: v1(-283.85,-1031.92) -281.92,-1031.92 -264,-1014 -264,-990.7 -243.3,-970 -223.55,-970 U2.N8@-206.5,-952.95 ; U1.R4@141.49,-205.51 v1(157.24,-221.26) ; v1(317.64,-1031.92) 319.58,-1031.92 337.5,-1014 337.5,-990.7 358.2,-970 377.94,-970 U3.N8@394.99,-952.95
  Layer 1 w5: v1(-283.85,-1031.92) -281.77,-1034 -242,-1034 -201.5,-1074.5 -101.5,-1074.5 -58.46,-1031.46 32.2,-1031.46 v1(33,-1030.66) ; v1@33,-1031.46 85.46,-1031.46 94.5,-1040.5 96.27,-1042.27 100.41,-1042.27 100.91,-1041.76 103.04,-1041.76 107.99,-1046.71 107.99,-1048.83 102.83,-1053.99 102.83,-1056.11 107.78,-1061.06 109.91,-1061.06 114.68,-1056.28 116.8,-1056.28 121.75,-1061.23 121.75,-1063.35 117.48,-1067.62 117.48,-1069.75 122.43,-1074.7 124.55,-1074.7 128.69,-1074.69 133,-1079 162,-1079 189,-1079 236.08,-1031.92 v1(317.64,-1031.92) ; v1(103,-484) 104,-484 124,-464 141,-447 141,-325 141,-279.98 153.73,-267.26 163.24,-267.26 171.74,-258.76 171.74,-235.76 v1(157.24,-221.26)
  Layer 2 w5: v1(33,-1030.66) 48.88,-1030.66 64,-1015.54 64,-1013.04 61.07,-1010.11 49.7,-1010.11 47.5,-1007.91 47.5,-1001.31 49.7,-999.11 61.8,-999.11 64,-996.91 64,-990.31 61.8,-988.11 47.06,-988.11 44.86,-985.91 44.86,-979.31 47.06,-977.11 61.8,-977.11 64,-974.91 64,-968.31 61.8,-966.11 49.7,-966.11 47.5,-963.91 47.5,-957.31 49.7,-955.11 61.8,-955.11 64,-952.91 64,-946.31 61.8,-944.11 49.7,-944.11 47.5,-941.91 47.5,-935.31 49.7,-933.11 61.8,-933.11 64,-930.91 64,-924.31 61.8,-922.11 49.7,-922.11 47.5,-919.91 47.5,-913.31 49.7,-911.11 61.8,-911.11 64,-908.91 64,-902.31 61.8,-900.11 56.41,-900.11 54.21,-897.91 54.21,-891.31 56.41,-889.11 61.07,-889.11 64,-886.19 64,-829 64,-797.75 64,-795.25 61.07,-792.32 60.2,-792.32 58,-790.12 58,-783.52 60.2,-781.32 63.53,-781.32 65.73,-779.12 65.73,-772.52 63.53,-770.32 60.2,-770.32 58,-768.12 58,-761.52 60.2,-759.32 65.35,-759.32 67.55,-757.12 67.55,-750.52 65.35,-748.32 60.2,-748.32 58,-746.12 58,-739.52 60.2,-737.32 74.8,-737.32 77,-735.12 77,-728.52 74.8,-726.32 60.2,-726.32 58,-724.12 58,-717.52 60.2,-715.32 74.8,-715.32 77,-713.12 77,-706.52 74.8,-704.32 60.2,-704.32 58,-702.12 58,-695.52 60.2,-693.32 74.8,-693.32 77,-691.12 77,-684.52 74.8,-682.32 60.2,-682.32 58,-680.12 58,-673.52 60.2,-671.32 74.8,-671.32 77,-669.12 77,-662.52 74.8,-660.32 60.2,-660.32 58,-658.12 58,-651.52 60.2,-649.32 74.8,-649.32 77,-647.12 77,-640.52 74.8,-638.32 60.2,-638.32 58,-636.12 58,-629.52 60.2,-627.32 74.8,-627.32 77,-625.12 77,-618.52 74.8,-616.32 60.2,-616.32 58,-614.12 58,-607.52 60.2,-605.32 74.8,-605.32 77,-603.12 77,-596.52 74.8,-594.32 60.2,-594.32 58,-592.12 58,-585.52 60.2,-583.32 74.8,-583.32 77,-581.12 77,-574.52 74.8,-572.32 60.2,-572.32 58,-570.12 58,-563.52 60.2,-561.32 74.8,-561.32 77,-559.12 77,-552.52 74.8,-550.32 60.2,-550.32 58,-548.12 58,-541.52 60.2,-539.32 61.07,-539.32 64,-536.39 64,-523 69.3,-517.7 71.07,-515.93 71.07,-511.79 59.56,-500.27 59.56,-497.16 64.22,-492.49 67.33,-492.49 86,-511.16 89.11,-511.16 93.78,-506.49 93.78,-503.38 90.77,-500.37 90.77,-496.23 94,-493 v1(103,-484)
  Bottom w4.2: v1(33,-1030.66) 61.65,-1030.66 62.45,-1031.46 R47.2@65,-1028.91
DDR3_BA2: R48.2 U1.J5 U2.M3 U3.M3 | length 2343.6
  Top w4.2: U2.M3@-363.98,-921.45 -362.26,-923.18 -346.63,-923.18 v1(-316.85,-952.95) ; v1(-63.19,-190) -63.19,-189.86 -47.49,-174.16 U1.J5@-47.49,-174.02 ; v1(-23.1,-459) -23,-459.1 -23,-484 -39,-500 -39,-510 -39,-612.14 -36.54,-614.6 -27.96,-614.6 -26.58,-615.98 -26.58,-622.42 -27.96,-623.8 -46.62,-623.8 -48,-625.18 -48,-631.62 -46.62,-633 -26.58,-633 -25.2,-634.38 -25.2,-640.82 -26.58,-642.2 -46.62,-642.2 -48,-643.58 -48,-650.02 -46.62,-651.4 -26.58,-651.4 -25.2,-652.78 -25.2,-659.22 -26.58,-660.6 -46.62,-660.6 -48,-661.98 -48,-668.42 -46.62,-669.8 -26.58,-669.8 -25.2,-671.18 -25.2,-677.62 -26.58,-679 -46.62,-679 -48,-680.38 -48,-686.82 -46.62,-688.2 -26.58,-688.2 -25.2,-689.58 -25.2,-696.02 -26.58,-697.4 -46.62,-697.4 -48,-698.78 -48,-705.22 -46.62,-706.6 -26.58,-706.6 -25.2,-707.98 -25.2,-714.42 -26.58,-715.8 -46.62,-715.8 -48,-717.18 -48,-723.62 -46.62,-725 -37.11,-725 -35.73,-726.38 -35.73,-732.82 -37.11,-734.2 -50.42,-734.2 -51.8,-735.58 -51.8,-742.02 -50.42,-743.4 -40.38,-743.4 -39,-744.78 -39,-751.22 -40.38,-752.6 -50.42,-752.6 -51.8,-753.98 -51.8,-760.42 -50.42,-761.8 -40.38,-761.8 -39,-763.18 -39,-769.62 -40.38,-771 -50.42,-771 -51.8,-772.38 -51.8,-778.82 -50.42,-780.2 -40.38,-780.2 -39,-781.58 -39,-788.02 -40.38,-789.4 -50.42,-789.4 -51.8,-790.78 -51.8,-797.22 -50.42,-798.6 -40.38,-798.6 -39,-799.98 -39,-806.42 -40.38,-807.8 -50.42,-807.8 -51.8,-809.18 -51.8,-815.62 -50.42,-817 -40.38,-817 -39,-818.38 -39,-824.82 -40.38,-826.2 -50.42,-826.2 -51.8,-827.58 -51.8,-834.02 -50.42,-835.4 -34.7,-835.4 -33.32,-836.78 -33.32,-843.22 -34.7,-844.6 -50.42,-844.6 -51.8,-845.98 -51.8,-852.42 -50.42,-853.8 -26.58,-853.8 -25.2,-855.18 -25.2,-861.62 -26.58,-863 -50.42,-863 -51.8,-864.38 -51.8,-870.82 -50.42,-872.2 -26.58,-872.2 -25.2,-873.58 -25.2,-880.02 -26.58,-881.4 -50.42,-881.4 -51.8,-882.78 -51.8,-889.22 -50.42,-890.6 -26.58,-890.6 -25.2,-891.98 -25.2,-898.42 -26.58,-899.8 -50.42,-899.8 -51.8,-901.18 -51.8,-907.62 -50.42,-909 -26.58,-909 -25.2,-910.38 -25.2,-916.82 -26.58,-918.2 -50.42,-918.2 -51.8,-919.58 -51.8,-926.02 -50.42,-927.4 -26.58,-927.4 -25.2,-928.78 -25.2,-935.22 -26.58,-936.6 -45.15,-936.6 -46.53,-937.98 -46.53,-944.42 -45.15,-945.8 -24.2,-945.8 -22.1,-947.9 -17.51,-952.49 v1(0,-952.49) ; U3.M3@237.51,-921.45 239.24,-923.18 254.87,-923.18 v1(284.64,-952.95)
  Layer 1 w5: v1(-316.85,-952.95) -231.05,-952.95 -209,-975 -102,-975 -79.49,-952.49 v1(0,-952.49) 106.49,-952.49 112.73,-958.73 129,-975 129.38,-975 132.3,-977.93 132.3,-978.5 133.8,-980 140.8,-980 142.3,-978.5 142.3,-972.5 143.8,-971 150.8,-971 152.3,-972.5 152.3,-978.5 153.8,-980 160.8,-980 162.3,-978.5 162.3,-972.58 163.8,-971.08 170.8,-971.08 172.3,-972.58 172.3,-977.93 173.8,-979.43 180.8,-979.43 182.3,-977.93 185.23,-975 197,-975 219.05,-952.95 v1(284.64,-952.95) ; v1(-63.19,-190) -63.47,-190 -79,-205.53 -79,-403 -23.1,-458.9 v1(-23.1,-459)
  Bottom w4.2: R48.2@-32,-952.5 v1(0,-952.49)
DDR3_CAS: R51.2 U1.P5 U2.K3 U3.K3 | length 2378.9
  Top w4.2: U2.K3@-363.98,-858.46 -348.45,-874 -312.87,-874 -283.85,-903.02 v1(-283.85,-905.94) ; v1(33,-905.47) 33.67,-906.15 44.15,-906.15 63,-925 63,-1009.81 74.19,-1021 92,-1021 102,-1011 102,-1008.9 99.54,-1006.44 98.48,-1006.44 97.1,-1005.06 97.1,-998.62 98.48,-997.24 103.42,-997.24 104.8,-995.86 104.8,-989.42 103.42,-988.04 98.48,-988.04 97.1,-986.66 97.1,-980.22 98.48,-978.84 103.42,-978.84 104.8,-977.46 104.8,-971.02 103.42,-969.64 98.48,-969.64 97.1,-968.26 97.1,-961.82 98.48,-960.44 103.42,-960.44 104.8,-959.06 104.8,-952.62 103.42,-951.24 98.48,-951.24 97.1,-949.86 97.1,-943.42 98.48,-942.04 103.42,-942.04 104.8,-940.66 104.8,-934.22 103.42,-932.84 98.48,-932.84 97.1,-931.46 97.1,-925.02 98.48,-923.64 103.42,-923.64 104.8,-922.26 104.8,-915.82 103.42,-914.44 98.48,-914.44 97.1,-913.06 97.1,-906.62 98.48,-905.24 99.54,-905.24 102,-902.78 102,-806.5 99.54,-804.04 98.48,-804.04 97.1,-802.66 97.1,-796.22 98.48,-794.84 103.42,-794.84 104.8,-793.46 104.8,-787.02 103.42,-785.64 98.48,-785.64 97.1,-784.26 97.1,-777.82 98.48,-776.44 103.42,-776.44 104.8,-775.06 104.8,-768.62 103.42,-767.24 98.48,-767.24 97.1,-765.86 97.1,-759.42 98.48,-758.04 103.42,-758.04 104.8,-756.66 104.8,-750.22 103.42,-748.84 98.48,-748.84 97.1,-747.46 97.1,-741.02 98.48,-739.64 103.42,-739.64 104.8,-738.26 104.8,-731.82 103.42,-730.44 98.48,-730.44 97.1,-729.06 97.1,-722.62 98.48,-721.24 103.42,-721.24 104.8,-719.86 104.8,-713.42 103.42,-712.04 98.48,-712.04 97.1,-710.66 97.1,-704.22 98.48,-702.84 103.42,-702.84 104.8,-701.46 104.8,-695.02 103.42,-693.64 98.48,-693.64 97.1,-692.26 97.1,-685.82 98.48,-684.44 103.42,-684.44 104.8,-683.06 104.8,-676.62 103.42,-675.24 98.48,-675.24 97.1,-673.86 97.1,-667.42 98.48,-666.04 99.54,-666.04 102,-663.58 102,-556 102,-535 110.76,-526.24 114.24,-526.24 115.23,-527.22 117.18,-527.22 121.73,-522.67 121.73,-520.72 117.28,-516.27 117.28,-514.32 121.83,-509.76 123.79,-509.76 128.24,-514.21 130.19,-514.21 134.74,-509.66 134.74,-507.71 128.03,-501 128.03,-499.04 132.58,-494.49 134.54,-494.49 141.25,-501.2 143.2,-501.2 147.75,-496.65 147.75,-494.7 146.77,-493.71 146.77,-490.23 155,-482 159,-478 159,-467.22 161.46,-464.76 166.42,-464.76 167.8,-463.38 167.8,-456.94 166.42,-455.56 161.46,-455.56 159,-453.1 159,-438 159,-427 154.05,-422.05 154.05,-418.57 161.54,-411.08 161.54,-409.13 156.98,-404.58 155.03,-404.58 146.06,-413.55 144.1,-413.55 139.55,-409 139.55,-407.05 148.52,-398.07 148.52,-396.12 143.97,-391.57 142.02,-391.57 134.53,-399.05 131.05,-399.05 123.5,-391.5 v1(116,-384) ; U1.P5@109.99,-174.02 v1(125.74,-189.76) ; U3.K3@237.51,-858.46 253.05,-874 288.63,-874 317.64,-903.02 v1(317.64,-905.94)
  Layer 1 w5: v1(-283.85,-905.94) -243.06,-905.94 -229.57,-919.43 -106.43,-919.43 -92.47,-905.47 v1(33,-905.47) ; v1(33,-905.47) 120.51,-905.51 134.43,-919.43 195.57,-919.43 209.06,-905.94 221.56,-905.94 224.49,-908.86 224.49,-910.95 225.99,-912.45 232.99,-912.45 234.49,-910.95 234.49,-906.02 235.99,-904.52 242.99,-904.52 244.49,-906.02 244.49,-910.95 245.99,-912.45 252.99,-912.45 254.49,-910.95 254.49,-900.23 255.99,-898.73 262.99,-898.73 264.49,-900.23 264.49,-903.01 267.42,-905.94 292,-905.94 v1(317.64,-905.94) ; v1(116,-384) 116,-381.02 107,-372.02 107,-366 107,-353.5 109.93,-350.57 130.5,-350.57 132,-349.07 132,-342.07 130.5,-340.57 108.5,-340.57 107,-339.07 107,-332.07 108.5,-330.57 130.5,-330.57 132,-329.07 132,-322.07 130.5,-320.57 108.5,-320.57 107,-319.07 107,-312.07 108.5,-310.57 130.5,-310.57 132,-309.07 132,-302.07 130.5,-300.57 109.93,-300.57 107,-297.64 107,-282.49 121.49,-268 122.23,-267.26 131.75,-267.26 140.24,-258.76 140.24,-204.26 v1(125.74,-189.76)
  Bottom w4.2: v1(33,-905.47) 63.71,-905.47 R51.2@65,-904.18
DDR3_CKE: R54.2 U1.N3 U2.K9 U3.K9 | length 2451.5
  Top w4.2: v1(-283.85,-937.43) -262.69,-916.27 -262.69,-889.69 -247,-874 -190.55,-874 U2.K9@-175.01,-858.46 ; U1.N3@78.5,-237.01 v1(94.24,-252.76) ; v1(317.64,-937.43) 338.81,-916.27 338.81,-889.69 354.5,-874 410.95,-874 U3.K9@426.49,-858.46
  Layer 1 w5: v1(-283.85,-937.43) -228.57,-937.43 -204,-962 -109,-962 -83.97,-936.97 v1(33,-936.97) 51,-936.97 63.5,-936.97 66.43,-939.9 66.43,-941.99 67.93,-943.49 74.93,-943.49 76.43,-941.99 76.43,-935.92 77.93,-934.42 84.93,-934.42 86.43,-935.92 86.43,-941.99 87.93,-943.49 94.93,-943.49 96.43,-941.99 96.43,-932.3 97.93,-930.8 104.93,-930.8 106.43,-932.3 106.43,-934.04 109.36,-936.97 109.97,-936.97 135,-962 144,-962 191,-962 215.57,-937.43 v1(317.64,-937.43)
  Layer 2 w5: v1(33,-936.97) 18.5,-922.47 18.5,-862.5 22,-859 42.57,-838.43 52.8,-838.43 55,-836.23 55,-829.63 52.8,-827.43 40.55,-827.43 38.35,-825.23 38.35,-818.63 40.55,-816.43 52.8,-816.43 55,-814.23 55,-807.63 52.8,-805.43 40.45,-805.43 38.25,-803.23 38.25,-796.63 40.45,-794.43 46.8,-794.43 49,-792.23 49,-785.63 46.8,-783.43 26.2,-783.43 24,-781.23 24,-774.63 26.2,-772.43 46.8,-772.43 49,-770.23 49,-763.63 46.8,-761.43 26.2,-761.43 24,-759.23 24,-752.63 26.2,-750.43 46.8,-750.43 49,-748.23 49,-741.63 46.8,-739.43 26.2,-739.43 24,-737.23 24,-730.63 26.2,-728.43 46.8,-728.43 49,-726.23 49,-719.63 46.8,-717.43 26.2,-717.43 24,-715.23 24,-708.63 26.2,-706.43 46.8,-706.43 49,-704.23 49,-697.63 46.8,-695.43 26.2,-695.43 24,-693.23 24,-686.63 26.2,-684.43 46.8,-684.43 49,-682.23 49,-675.63 46.8,-673.43 26.2,-673.43 24,-671.23 24,-664.63 26.2,-662.43 46.8,-662.43 49,-660.23 49,-653.63 46.8,-651.43 32.9,-651.43 30.7,-649.23 30.7,-642.63 32.9,-640.43 46.07,-640.43 49,-637.5 49,-507 49,-487 51.5,-484.5 51.5,-480.36 48.57,-477.43 39.7,-477.43 37.5,-475.23 37.5,-468.63 39.7,-466.43 80.5,-466.43 82.7,-464.23 82.7,-457.63 80.5,-455.43 39.7,-455.43 37.5,-453.23 37.5,-446.63 39.7,-444.43 72.8,-444.43 75,-442.23 75,-435.63 72.8,-433.43 39.7,-433.43 37.5,-431.23 37.5,-424.63 39.7,-422.43 77.72,-422.43 79.92,-420.23 79.92,-413.63 77.72,-411.43 39.7,-411.43 37.5,-409.23 37.5,-402.63 39.7,-400.43 75.3,-400.43 77.5,-398.23 77.5,-391.63 75.3,-389.43 45.7,-389.43 43.5,-387.23 43.5,-380.63 45.7,-378.43 59.57,-378.43 62.5,-375.5 62.5,-364 62.5,-284.5 v1(94.24,-252.76)
  Bottom w4.2: v1(33,-936.97) 63.39,-936.97 R54.2@65,-935.36
DDR3_CLK0_N: R57.1 U1.M2 U2.K7 U3.K7 | length 2538.7
  Top w4: v1(-292.92,-836.88) -290.02,-836.88 -284.58,-831.44 -273.42,-831.44 -255.14,-849.71 -246.03,-849.71 -238,-857.74 U2.K7@-238,-858.46 ; v1(23.93,-836.42) 26.83,-836.42 32.28,-830.98 43.65,-830.98 57,-817.63 57,-803.86 57,-791.96 46.46,-781.42 45.92,-781.42 45.92,-772.42 48.8,-772.42 57,-764.22 57,-743.62 48.8,-735.42 14.48,-735.42 14.48,-726.42 60.34,-726.42 68.55,-718.22 68.55,-697.62 60.34,-689.42 12,-689.42 12,-680.42 57.62,-680.42 65.82,-672.22 65.82,-651.62 57.62,-643.42 12,-643.42 12,-634.42 60.34,-634.42 68.55,-626.22 68.55,-605.62 60.34,-597.42 12,-597.42 12,-588.42 57.62,-588.42 65.82,-580.22 65.82,-559.62 57.62,-551.42 12,-551.42 12,-542.42 60.34,-542.42 68.55,-534.22 68.55,-513.62 60.34,-505.42 15.2,-505.42 15.2,-496.42 57.62,-496.42 65.82,-488.22 65.82,-467.62 57.62,-459.42 15.2,-459.42 15.2,-450.42 57.55,-450.42 65.75,-442.22 65.75,-421.62 57.55,-413.42 17.93,-413.42 17.93,-404.42 46.46,-404.42 57,-393.88 57,-378.06 57,-338 62,-333 62,-283.5 U1.M2@47,-268.5 ; v1(308.58,-836.88) 311.48,-836.88 316.92,-831.44 328.08,-831.44 346.36,-849.71 355.47,-849.71 363.5,-857.74 U3.K7@363.5,-858.46
  Layer 1 w4: v1(-292.92,-836.88) -291.52,-836.88 -284.58,-829.94 -253.38,-829.94 -237.44,-814 -216,-814 -152.39,-814 -126.22,-814 -117.43,-805.21 -117.43,-755.35 -116.08,-754 -109.78,-754 -108.43,-755.35 -108.43,-819.08 -100.64,-826.87 -85.23,-826.87 -77.43,-819.08 -77.43,-794.58 -76.08,-793.23 -69.78,-793.23 -68.43,-794.58 -68.43,-810.57 -49.52,-829.48 -20,-829.48 15.59,-829.48 22.53,-836.42 v1(23.93,-836.42) 25.33,-836.42 32.28,-829.48 66.56,-829.48 77,-819.03 77,-809.79 79.34,-807.44 100.66,-807.44 103,-809.79 103,-820.66 111.79,-829.44 130.67,-829.44 137.11,-823 137.11,-822.94 151.22,-808.83 151.22,-808.78 159,-808.78 170.1,-808.78 172.44,-811.12 172.44,-822.57 180.24,-830.36 195.65,-830.36 203.44,-822.57 203.44,-806.07 204.79,-804.72 211.09,-804.72 212.44,-806.07 212.44,-841.94 220.24,-849.73 235.65,-849.73 243.44,-841.94 243.44,-797.97 244.79,-796.62 251.09,-796.62 252.44,-797.97 252.44,-836.67 260.24,-844.46 275.65,-844.46 283.44,-836.67 283.44,-832.28 285.79,-829.94 298.88,-829.94 300.23,-829.94 307.17,-836.88 v1(308.58,-836.88)
  Bottom w4: v1(308.58,-836.88) 311.48,-836.88 316.92,-831.44 322.81,-831.44 325.16,-833.78 325.16,-835.84 R57.1@333,-843.68
DDR3_CLK0_P: R57.2 U1.L2 U2.J7 U3.J7 | length 2538.7
  Top w4: v1(-293,-812) -290.1,-812 -284.66,-817.44 -267.62,-817.44 -249.34,-835.71 -246.03,-835.71 -238,-827.68 U2.J7@-238,-826.97 ; U1.L2@15.5,-268.5 30.57,-283.57 30.57,-290.49 30.57,-319.49 28.22,-321.83 24.95,-321.83 23.6,-323.18 23.6,-329.48 24.95,-330.83 35.03,-330.83 43,-338.8 43,-342 43,-362.38 40.66,-364.72 39.54,-364.72 38.19,-366.07 38.19,-372.37 39.54,-373.72 40.66,-373.72 43,-376.06 43,-378.06 43,-388.08 40.66,-390.42 12.13,-390.42 3.93,-398.62 3.93,-419.22 12.13,-427.42 51.75,-427.42 51.75,-436.42 9.4,-436.42 1.2,-444.62 1.2,-465.22 9.4,-473.42 51.82,-473.42 51.82,-482.42 9.4,-482.42 1.2,-490.62 1.2,-511.22 9.4,-519.42 54.55,-519.42 54.55,-528.42 6.2,-528.42 -2,-536.62 -2,-557.22 6.2,-565.42 51.82,-565.42 51.82,-574.42 6.2,-574.42 -2,-582.62 -2,-603.22 6.2,-611.42 54.55,-611.42 54.55,-620.42 6.2,-620.42 -2,-628.62 -2,-649.22 6.2,-657.42 51.82,-657.42 51.82,-666.42 6.2,-666.42 -2,-674.62 -2,-695.22 6.2,-703.42 54.55,-703.42 54.55,-712.42 8.68,-712.42 0.48,-720.62 0.48,-741.22 8.68,-749.42 43,-749.42 43,-758.42 40.12,-758.42 31.92,-766.62 31.92,-787.22 40.12,-795.42 40.66,-795.42 43,-797.76 43,-803.86 43,-811.83 37.85,-816.98 32.2,-816.98 26.76,-811.54 v1(23.85,-811.54) ; v1(308.5,-812) 311.4,-812 316.84,-817.44 333.88,-817.44 352.15,-835.71 355.47,-835.71 363.5,-827.68 U3.J7@363.5,-826.97
  Layer 1 w4: v1(-293,-812) -291.6,-812 -284.66,-818.94 -257.94,-818.94 -242,-803 -216,-803 -147.83,-803 -130.78,-803 -128.43,-800.66 -128.43,-750.79 -120.64,-743 -105.23,-743 -97.43,-750.79 -97.43,-814.52 -96.08,-815.87 -89.78,-815.87 -88.43,-814.52 -88.43,-790.02 -80.64,-782.23 -65.23,-782.23 -57.43,-790.02 -57.43,-806.01 -44.97,-818.48 -20,-818.48 15.51,-818.48 22.45,-811.54 v1(23.85,-811.54) 25.26,-811.54 32.2,-818.48 62,-818.48 66,-814.48 66,-805.23 74.79,-796.44 105.21,-796.44 114,-805.23 114,-816.1 116.34,-818.44 126.11,-818.44 126.11,-818.39 140.22,-804.28 140.22,-804.22 146.67,-797.78 159,-797.78 174.66,-797.78 183.44,-806.56 183.44,-818.01 184.79,-819.36 191.09,-819.36 192.44,-818.01 192.44,-801.52 200.24,-793.72 215.65,-793.72 223.44,-801.52 223.44,-837.38 224.79,-838.73 231.09,-838.73 232.44,-837.38 232.44,-793.42 240.24,-785.62 255.65,-785.62 263.44,-793.42 263.44,-832.11 264.79,-833.46 271.09,-833.46 272.44,-832.11 272.44,-827.73 281.23,-818.94 298.88,-818.94 300.15,-818.94 307.1,-812 v1(308.5,-812)
  Bottom w4: v1(308.5,-812) 311.4,-812 316.84,-817.44 322.81,-817.44 325.16,-815.1 325.16,-812.16 R57.2@333,-804.31
DDR3_D0: U1.C3 U2.F8 | length 741.2
  Top w4.2: v1(-252.21,-252.76) U1.C3@-236.46,-237.01 ; U2.F8@-206.5,-732.48 v1(-190.76,-716.73)
  Layer 1 w5: v1(-252.21,-252.76) -237.71,-267.26 -237.71,-292.16 -230.94,-298.94 -229.17,-300.7 -225.03,-300.7 -224.13,-299.81 -222.01,-299.81 -217.06,-304.76 -217.06,-306.88 -225.55,-315.37 -225.55,-317.49 -220.6,-322.44 -218.48,-322.44 -215.03,-318.99 -210.88,-318.99 -205,-324.87 -205,-338 -205,-339 -205.26,-339.26 -205.26,-351.45 -205.26,-361.64 -202.33,-364.57 -197.21,-364.57 -195.71,-366.07 -195.71,-373.07 -197.21,-374.57 -203.76,-374.57 -205.26,-376.07 -205.26,-383.07 -203.76,-384.57 -192.85,-384.57 -191.35,-386.07 -191.35,-393.07 -192.85,-394.57 -203.76,-394.57 -205.26,-396.07 -205.26,-403.07 -203.76,-404.57 -192.85,-404.57 -191.35,-406.07 -191.35,-413.07 -192.85,-414.57 -203.76,-414.57 -205.26,-416.07 -205.26,-423.07 -203.76,-424.57 -192.85,-424.57 -191.35,-426.07 -191.35,-433.07 -192.85,-434.57 -203.76,-434.57 -205.26,-436.07 -205.26,-443.07 -203.76,-444.57 -192.85,-444.57 -191.35,-446.07 -191.35,-453.07 -192.85,-454.57 -203.76,-454.57 -205.26,-456.07 -205.26,-463.07 -203.76,-464.57 -192.85,-464.57 -191.35,-466.07 -191.35,-473.07 -192.85,-474.57 -203.76,-474.57 -205.26,-476.07 -205.26,-483.07 -203.76,-484.57 -192.85,-484.57 -191.35,-486.07 -191.35,-493.07 -192.85,-494.57 -203.76,-494.57 -205.26,-496.07 -205.26,-503.07 -203.76,-504.57 -192.85,-504.57 -191.35,-506.07 -191.35,-513.07 -192.85,-514.57 -202.33,-514.57 -205.26,-517.5 -205.26,-530 -205.26,-702.23 v1(-190.76,-716.73)
DDR3_D1: U1.B3 U2.G2 | length 741.1
  Top w4.2: U2.G2@-395.48,-763.97 -395.48,-764.75 -381,-779.23 v1(-381,-780) ; v1(-276.5,-385) -299,-385 -310,-396 -324.94,-396 -335.1,-385.84 -335.1,-327.07 -334.8,-326.77 -334.8,-268 -320.35,-253.55 -284.5,-253.55 U1.B3@-267.96,-237.01
  Layer 1 w5: v1(-381,-780) -380.54,-779.54 -369.54,-779.54 -345.5,-755.5 -345.5,-709.5 -281,-645 -281,-415 -267,-401 -267,-392 -274,-385 v1(-276.5,-385)
DDR3_D2: U1.A2 U2.F2 | length 740.9
  Top w4.2: v1(-411.23,-716.73) U2.F2@-395.48,-732.48 ; v1(-315.2,-284.25) U1.A2@-299.46,-268.5
  Layer 1 w5: v1(-411.23,-716.73) -411.23,-716.41 -396.73,-701.91 -396.73,-681.72 -385.74,-670.73 -377.96,-670.73 -352,-644.77 -352,-395 -352,-392.5 -354.93,-389.57 -385.5,-389.57 -387,-388.07 -387,-381.07 -385.5,-379.57 -337,-379.57 -335.5,-378.07 -335.5,-371.07 -337,-369.57 -385.5,-369.57 -387,-368.07 -387,-361.07 -385.5,-359.57 -325,-359.57 -323.5,-358.07 -323.5,-351.07 -325,-349.57 -349.07,-349.57 -352,-346.64 -352,-332 -352,-321.05 v1(-315.2,-284.25)
DDR3_D3: U1.A4 U2.H3 | length 739.6
  Top w4.2: U2.H3@-363.98,-795.47 -350.3,-781.79 -336.79,-781.79 v1(-336,-781) ; U1.A4@-299.46,-205.51 -319.36,-205.51 -343.3,-229.46 -343.3,-389.24 -323.54,-409 -285.45,-409 -271.71,-422.74 -261.26,-422.74 v1(-260.78,-423.22)
  Layer 1 w5: v1(-336,-781) -324,-769 -324,-713 -269,-658 -269,-482.25 -269,-469.75 -266.07,-466.82 -265.36,-466.82 -263.86,-465.32 -263.86,-458.32 -265.36,-456.82 -266.07,-456.82 -269,-453.89 -269,-449 -259,-439 -259,-425 v1(-260.78,-423.22)
DDR3_D4: U1.D3 U2.H8 | length 740.9
  Top w4.2: v1(-220.5,-252.76) -220.5,-252.65 -204.97,-237.12 U1.D3@-204.97,-237.01 ; U2.H8@-206.5,-795.47 v1(-190.76,-779.72)
  Layer 1 w5: v1(-220.5,-252.76) -220.5,-254.71 -206,-269.21 -206,-290 -196.13,-299.87 -184.87,-299.87 -173,-311.74 -173,-332 -165,-340 -165,-453 -165,-470.35 -162.07,-473.28 -155.1,-473.28 -153.6,-474.78 -153.6,-481.78 -155.1,-483.28 -163.5,-483.28 -165,-484.78 -165,-491.78 -163.5,-493.28 -158,-493.28 -156.5,-494.78 -156.5,-501.78 -158,-503.28 -163.5,-503.28 -165,-504.78 -165,-511.78 -163.5,-513.28 -158,-513.28 -156.5,-514.78 -156.5,-521.78 -158,-523.28 -161.72,-523.28 -164.65,-526.21 -164.65,-530.35 -159.22,-535.78 -142.58,-552.42 -142.58,-569 -142.58,-587.64 -139.65,-590.57 -130.22,-590.57 -128.72,-592.07 -128.72,-599.07 -130.22,-600.57 -147.08,-600.57 -148.58,-602.07 -148.58,-609.07 -147.08,-610.57 -129.08,-610.57 -127.58,-612.07 -127.58,-619.07 -129.08,-620.57 -139.65,-620.57 -142.58,-623.5 -142.58,-636 -142.58,-720.32 -155.66,-733.39 -165.17,-733.39 -175.83,-744.05 -175.83,-764.8 v1(-190.76,-779.72)
DDR3_D5: U1.D1 U2.F7 | length 746.2
  Top w4.2: U2.F7@-238,-732.48 v1(-222.25,-716.73) ; v1(-221,-338) -221,-316.03 U1.D1@-204.97,-300
  Layer 1 w5: v1(-222.25,-716.73) -222.25,-696 -222.25,-693.5 -225.18,-690.57 -256,-690.57 -257.5,-689.07 -257.5,-682.07 -256,-680.57 -218.92,-680.57 -217.42,-679.07 -217.42,-672.07 -218.92,-670.57 -241,-670.57 -242.5,-669.07 -242.5,-662.07 -241,-660.57 -239.5,-659.07 -239.5,-652.07 -241,-650.57 -242.5,-649.07 -242.5,-642.07 -241,-640.57 -238.07,-640.57 -236.57,-639.07 -236.57,-632.07 -238.07,-630.57 -241,-627.64 -241,-581 -241,-559.25 -241,-546.75 -238.07,-543.82 -215.76,-543.82 -214.26,-542.32 -214.26,-535.32 -215.76,-533.82 -243.5,-533.82 -245,-532.32 -245,-525.32 -243.5,-523.82 -215.76,-523.82 -214.26,-522.32 -214.26,-515.32 -215.76,-513.82 -243.5,-513.82 -245,-512.32 -245,-505.32 -243.5,-503.82 -215.76,-503.82 -214.26,-502.32 -214.26,-495.32 -215.76,-493.82 -219,-493.82 -220.5,-492.32 -220.5,-485.32 -219,-483.82 -215.76,-483.82 -214.26,-482.32 -214.26,-475.32 -215.76,-473.82 -219,-473.82 -220.5,-472.32 -220.5,-465.32 -219,-463.82 -215.76,-463.82 -214.26,-462.32 -214.26,-455.32 -215.76,-453.82 -219,-453.82 -220.5,-452.32 -220.5,-445.32 -219,-443.82 -215.76,-443.82 -214.26,-442.32 -214.26,-435.32 -215.76,-433.82 -219,-433.82 -220.5,-432.32 -220.5,-425.32 -219,-423.82 -215.76,-423.82 -214.26,-422.32 -214.26,-415.32 -215.76,-413.82 -219,-413.82 -220.5,-412.32 -220.5,-405.32 -219,-403.82 -215.76,-403.82 -214.26,-402.32 -214.26,-395.32 -215.76,-393.82 -219,-393.82 -220.5,-392.32 -220.5,-385.32 -219,-383.82 -215.76,-383.82 -214.26,-382.32 -214.26,-375.32 -215.76,-373.82 -217.57,-373.82 -220.5,-370.89 -220.5,-365 -220.5,-338.5 v1(-221,-338)